# Altium PCB Audio_Meter_V3.2.PcbDoc (part 2 of 4)
Units mil, origin at the board's own origin, x right, y up, seen from the top; angles counter-clockwise.
Board outline 2756.14 x 2519.69 mil, 2 copper layers (Top Layer, Bottom Layer), stack 57 mil thick; 102 components, 57 nets, 306 pads, 131 vias.
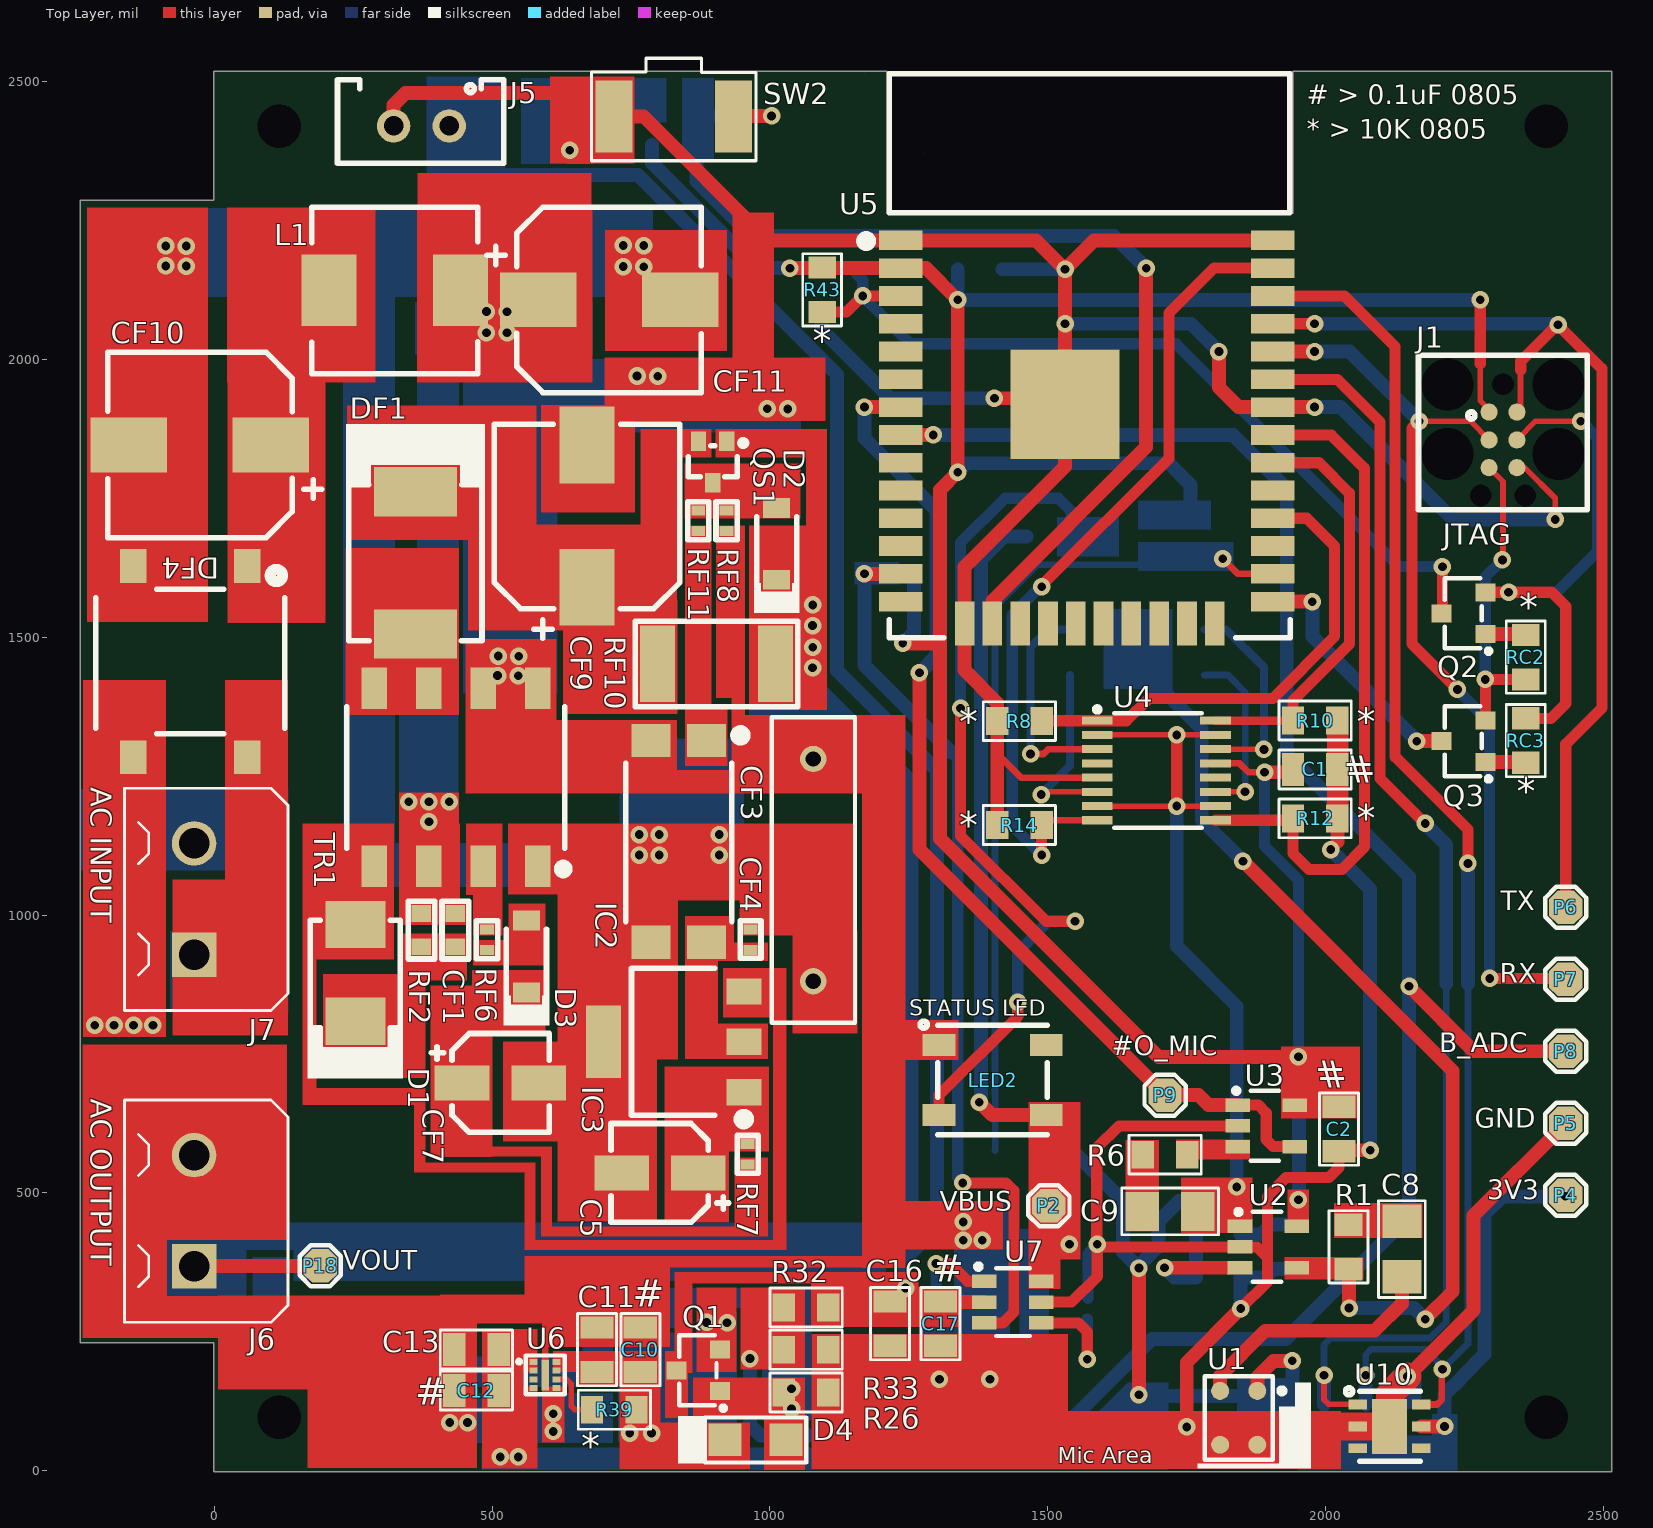
[diagram p0: Top Layer view]

## Part data (continued)
IC2: "OPTOISOLATOR 5.3KV TRANS 4SMD", Case/Package=SMD/SMT, Collector Emitter Saturation Voltage=400mV, Collector Emitter Voltage (VCEO)=70V, Current Transfer Ratio=320%, Forward Current=60mA, Forward Voltage=1.65V, Isolation Voltage=5.3kV, Manufacturer=Vishay, Max Collector Current=100mA, Max Operating Temperature=100°C, Max Power Dissipation=150mW, Min Operating Temperature=-55°C, Output Current per Channel=50mA, Package Quantity=2000, Reverse Breakdown Voltage=6V, Supplier Part Number 1=SFH615A-4X018TCT-ND, Category=Optocouplers, Fall Time=15us, Manufacturer Part Number=SFH615A-4X018T, Max Input Current=60mA, Max Output Voltage=70V, Mount="Surface Mount", Number of Channels=1, Number of Elements=1, Number of Pins=4, Packaging="Tape and Reel", Power Dissipation=150mW, Pricing 1="1=1.06000, 10=0.82300, 100=0.52880, 500=0.44650, 1000=0.35250 (USD)", Radiation Hardening=No, Rise Time=4us, RoHS=Yes, Stock 1=1486, Supplier 1=Digi-Key
IC3: "IC CTLR/MOSFET 100KHZ SOT223", Breakdown Voltage=700V, Case/Package=SOT-223-4, Manufacturer="ON Semiconductor", Max Input Voltage=250V, Max Operating Temperature=125°C, Max Output Current=450mA, Max Power Dissipation=19W, Max Supply Voltage=10V, Min Input Voltage=100V, Min Operating Temperature=-40°C, Package Quantity=1, Supplier Part Number 1=NCP1014ST100T3GOSCT-ND, Switching Frequency=100kHz, Category="Power Products", ComponentLink1Description=https://datasheet.ciiva.com/1930/ncp1010-d-1930949.pdf?src-supplier=Digi-Key, ComponentLink1URL=https://datasheet.ciiva.com/1930/ncp1010-d-1930949.pdf?src-supplier=Digi-Key, ComponentLink2Description=https://datasheet.ciiva.com/1930/ncp1010-d-1930950.pdf?src-supplier=Digi-Key, ComponentLink2URL=https://datasheet.ciiva.com/1930/ncp1010-d-1930950.pdf?src-supplier=Digi-Key, ComponentLink3Description=https://datasheet.ciiva.com/8197/ncp1010-d-8197482.pdf?src-supplier=Avnet, ComponentLink3URL=https://datasheet.ciiva.com/8197/ncp1010-d-8197482.pdf?src-supplier=Avnet, ComponentLink4Description=https://datasheet.ciiva.com/26081/ncp1010-d-26081498.pdf?src-supplier=Avnet+Europe, ComponentLink4URL=https://datasheet.ciiva.com/26081/ncp1010-d-26081498.pdf?src-supplier=Avnet+Europe, ComponentLink5Description=https://datasheet.ciiva.com/16469/ncp1010-d-16469819.pdf?src-supplier=Future+Electronics, ComponentLink5URL=https://datasheet.ciiva.com/16469/ncp1010-d-16469819.pdf?src-supplier=Future+Electronics, ComponentLink6Description=https://datasheet.ciiva.com/22628/1712830-22628780.pdf?src-supplier=Element14, ComponentLink6URL=https://datasheet.ciiva.com/22628/1712830-22628780.pdf?src-supplier=Element14, Duty Cycle=72%, Halogen Free="Halogen Free", Height=1.65mm, Lead Free="Lead Free", Length=6.7mm, Manufacturer Part Number=NCP1014ST100T3G, Max Duty Cycle=72%, Max Input Voltage (AC)=250V, Min Input Voltage (AC)=100V, Number of Pins=4, Output Current=450mA, Packaging="Tape and Reel", Power Rating=19W, Pricing 1="1=1.09000, 10=0.97200, 25=0.92280, 100=0.70840, 250=0.62604, 500=0.59310, 1000=0.46130 (USD)", Radiation Hardening=No, REACH SVHC="No SVHC", RoHS=Yes, Stock 1=17305, Supplier 1=Digi-Key, Topology=Flyback, Width=3.7mm
J1: "CABLE ADAPTER 6 POS", Manufacturer=Tag-Connect, Package Quantity=1, Supplier Part Number 1=TC2030-IDC-ND, ComponentLink1Description=http://www.tag-connect.com/Materials/TC2030-MCP%20Datasheet.pdf?src-supplier=Digi-Key, ComponentLink1URL=http://www.tag-connect.com/Materials/TC2030-MCP%20Datasheet.pdf?src-supplier=Digi-Key, Manufacturer Part Number=TC2030-IDC, Pricing 1="1=43.71 (USD)", Stock 1=284, Supplier 1=Digi-Key
J5: "CONN HEADER VERT 2POS 2.5MM", Color=Natural, Contact Resistance=20mR, Current Rating=3A, Housing Color=White, Manufacturer=JST, Max Operating Temperature=85°C, Max Voltage Rating (AC)=250V, Min Operating Temperature=-25°C, Supplier Part Number 1=455-1611-ND, ComponentLink1Description=http://uk.rs-online.com/webdocs/05aa/0900766b805aab1f.pdf?src-supplier=RSComponents, ComponentLink1URL=http://uk.rs-online.com/webdocs/05aa/0900766b805aab1f.pdf?src-supplier=RSComponents, ComponentLink2Description=http://www.jst-mfg.com/product/pdf/eng/eEH.pdf?src-supplier=Digi-Key, ComponentLink2URL=http://www.jst-mfg.com/product/pdf/eng/eEH.pdf?src-supplier=Digi-Key, ComponentLink3Description=https://www.verical.com/server-webapp/html/getDatasheet?partID=639961&src-supplier=Verical, ComponentLink3URL=https://www.verical.com/server-webapp/html/getDatasheet?partID=639961&src-supplier=Verical, ComponentLink4Description=http://www1.futureelectronics.com/doc/JST/B2B-EH-A(LF)(SN).pdf?src-supplier=Future+Electronics, ComponentLink4URL=http://www1.futureelectronics.com/doc/JST/B2B-EH-A(LF)(SN).pdf?src-supplier=Future+Electronics, ComponentLink5Description=http://www.produktinfo.conrad.com/datenblaetter/1200000-1299999/001217319-da-01-en-STIFTLEISTE_GERADE_2_POL__RM_25MM.pdf?src-supplier=Conrad, ComponentLink5URL=http://www.produktinfo.conrad.com/datenblaetter/1200000-1299999/001217319-da-01-en-STIFTLEISTE_GERADE_2_POL__RM_25MM.pdf?src-supplier=Conrad, Connector Type="Male Pin,Plug", Contact Material="Copper Alloy,Brass", Contact Mating Length=0.13inch, Contact Plating=Tin,Copper, Depth=3.8mm, Fastening Type=Detent, Gender=Male, Housing Material=Nylon, Lead Free="Lead Free", Length=7.5mm, Manufacturer Part Number=B2B-EH-A(LF)(SN), Max Current Rating=3A, Mount="Through Hole", Number of Contacts=2, Number of Positions=2, Number of Rows=1, Orientation=Straight, Packaging=Bulk, Pitch=2.5mm, Pricing 1="1=0.14, 10=0.131, 100=0.0809, 500=0.06698, 1000=0.05861, 5000=0.05024, 10000=0.04884 (USD)", Stock 1=25023, Supplier 1=Digi-Key, Termination=Press-Fit, Voltage Rating=250V
J6 J7: "TERMINAL BLOCK 2POS 5.08MM SIDE", Manufacturer="TE Connectivity", Manufacturer P/N=1776493-2
L1: library part DR74-821-R, "Inductor shielded 820uH 0.35A SMD", Case/Package=Nonstandard, Current Rating=310mA, DC Resistance (DCR)=2.93R, Inductance Tolerance=20%, Manufacturer="Eaton Cooper", Max Operating Temperature=125°C, Min Operating Temperature=-40°C, Package Quantity=1100, Resistor Type=Wirewound, Saturation Current=350mA, Self Resonant Frequency=100kHz, Supplier Part Number 1=513-1667-1-ND, Category="Fixed Inductors", ComponentLink1Description=https://datasheet.ciiva.com/14667/0900766b8116a153-14667792.pdf?src-supplier=RSComponents, ComponentLink1URL=https://datasheet.ciiva.com/14667/0900766b8116a153-14667792.pdf?src-supplier=RSComponents, ComponentLink2Description=https://datasheet.ciiva.com/26858/getdatasheetpartid-571272-26858465.pdf?src-supplier=Verical, ComponentLink2URL=https://datasheet.ciiva.com/26858/getdatasheetpartid-571272-26858465.pdf?src-supplier=Verical, ComponentLink3Description=https://datasheet.ciiva.com/30139/43bus-elx-ds-4315-dr-ser-30139975.pdf?src-supplier=Onlinecomponents.com, ComponentLink3URL=https://datasheet.ciiva.com/30139/43bus-elx-ds-4315-dr-ser-30139975.pdf?src-supplier=Onlinecomponents.com, ComponentLink4Description=https://datasheet.ciiva.com/16378/4a32919a-7470-4ae0-be45-b59e3a1351ef-16378457.pdf?src-supplier=Future+Electronics, ComponentLink4URL=https://datasheet.ciiva.com/16378/4a32919a-7470-4ae0-be45-b59e3a1351ef-16378457.pdf?src-supplier=Future+Electronics, ComponentLink5Description=https://datasheet.ciiva.com/4957/bus-elx-ds-4315-dr-series-4957657.pdf?src-supplier=Mouser, ComponentLink5URL=https://datasheet.ciiva.com/4957/bus-elx-ds-4315-dr-series-4957657.pdf?src-supplier=Mouser, ComponentLink6Description=https://datasheet.ciiva.com/8005/87246-8005245.pdf?src-supplier=Element14, ComponentLink6URL=https://datasheet.ciiva.com/8005/87246-8005245.pdf?src-supplier=Element14, ComponentLink7Description=https://datasheet.ciiva.com/48955/70037876-48955567.pdf?src-supplier=Allied+Electronics, ComponentLink7URL=https://datasheet.ciiva.com/48955/70037876-48955567.pdf?src-supplier=Allied+Electronics, Core Material=Ferrite, DC Current=310mA, Depth=7.6mm, Height=4.35mm, Height - Seated (Max)=0.171inch, Inductance=820uH, Lead Free="Lead Free", Length=7.6mm, Manufacturer Part Number=DR74-821-R, Max DC Current=310mA, Military Standard=Not, Mount="Surface Mount", Number of Pins=2, Packaging="Tape and Reel", Pricing 1="1=0.89000, 10=0.82900, 25=0.76520, 50=0.63760, 100=0.59930, 250=0.53552, 500=0.45900 (USD)", Radiation Hardening=No, REACH SVHC="No SVHC", RMS Current (Irms)=310mA, RoHS=Yes, Shielding=Shielded, Stock 1=498, Supplier 1=Digi-Key, Termination=SMD/SMT, Test Frequency=100kHz, Tolerance=20%, Weight=0.048oz, Width=0.299inch
LED2: "ADDRESS LED DISC SERIAL RGB 1=10", Color=Blue,Green,Red, Manufacturer="Adafruit Industries", Supplier Part Number 1=1528-1104-ND, ComponentLink1Description=https://cdn-shop.adafruit.com/product-files/1138/SK6812+LED+datasheet+.pdf?src-supplier=Digi-Key, ComponentLink1URL=https://cdn-shop.adafruit.com/product-files/1138/SK6812+LED+datasheet+.pdf?src-supplier=Digi-Key, ComponentLink2Description=http://www.mouser.com/ds/2/737/SK6812_LED_datasheet_-953546.pdf?src-supplier=Mouser, ComponentLink2URL=http://www.mouser.com/ds/2/737/SK6812_LED_datasheet_-953546.pdf?src-supplier=Mouser, Length=5mm, Manufacturer Part Number=1655, Mount="Surface Mount", Number of LEDs=10, Pricing 1="1=4.5 (USD)", Stock 1=2943, Supplier 1=Digi-Key, Width=5mm
P2 P4 P5 P6 P7 P8 P9 P18: "Test Point ON"
Q1: "MOSFET P-CHAN 24V SOT23", Case/Package=SOT-23, Continuous Drain Current (ID)=4.3A, Drain to Source Voltage (Vdss)=20V, Input Capacitance=634pF, Manufacturer=Diodes, Max Operating Temperature=150°C, Max Power Dissipation=800mW, Min Operating Temperature=-55°C, Supplier Part Number 1=DMP2045U-7DICT-ND, ComponentLink1Description=https://www.diodes.com/assets/Datasheets/DMP2045U.pdf?src-supplier=Digi-Key, ComponentLink1URL=https://www.diodes.com/assets/Datasheets/DMP2045U.pdf?src-supplier=Digi-Key, Manufacturer Part Number=DMP2045U-7, Mount="Surface Mount", Packaging="Tape and Reel", Pricing 1="1=0.45, 10=0.333, 100=0.1581, 500=0.12896, 1000=0.09568 (USD)", Rds On Max=45mR, Stock 1=22481, Supplier 1=Digi-Key
Q2 Q3: "TRANS NPN 40V 0.6A SMD SOT23-3", Case/Package=SOT-23, Collector Base Voltage (VCBO)=75V, Collector Emitter Breakdown Voltage=40V, Collector Emitter Saturation Voltage=1V, Continuous Collector Current=600mA, Current=1A, Emitter Base Voltage (VEBO)=6V, Frequency=300MHz, Manufacturer=Diodes, Max Operating Temperature=150°C, Max Power Dissipation=300mW, Min Operating Temperature=-55°C, Package Quantity=3000, Power Dissipation=350mW, Supplier Part Number 1=MMBT2222A-FDIDKR-ND, Collector Emitter Voltage (VCEO)=40V, ComponentLink1Description=http://www.diodes.com/datasheets/ds30041.pdf?src-supplier=Future+Electronics, ComponentLink1URL=http://www.diodes.com/datasheets/ds30041.pdf?src-supplier=Future+Electronics, ComponentLink2Description=http://www.diodes.com/datasheets/ds30041.pdf?src-supplier=Avnet, ComponentLink2URL=http://www.diodes.com/datasheets/ds30041.pdf?src-supplier=Avnet, ComponentLink3Description=https://www.verical.com/server-webapp/html/getDatasheet?partID=82692&src-supplier=Verical, ComponentLink3URL=https://www.verical.com/server-webapp/html/getDatasheet?partID=82692&src-supplier=Verical, ComponentLink4Description=https://www.diodes.com/assets/Datasheets/ds30041.pdf?src-supplier=Digi-Key, ComponentLink4URL=https://www.diodes.com/assets/Datasheets/ds30041.pdf?src-supplier=Digi-Key, ComponentLink5Description=http://www.diodes.com/datasheets/ds30041.pdf?src-supplier=Avnet+Europe, ComponentLink5URL=http://www.diodes.com/datasheets/ds30041.pdf?src-supplier=Avnet+Europe, ComponentLink6Description=http://www.diodes.com/datasheets/ds30041.pdf?src-supplier=Element14, ComponentLink6URL=http://www.diodes.com/datasheets/ds30041.pdf?src-supplier=Element14, Contact Plating=Matte,Tin, Current Rating=600mA, Element Configuration=Single, Gain Bandwidth Product=300MHz, Height=1mm, hFE Min=100, Lead Free="Lead Free", Length=3.05mm, Manufacturer Part Number=MMBT2222A-7-F, Max Breakdown Voltage=40V, Max Collector Current=600mA, Max Frequency=300MHz, Mount="Surface Mount", Number of Elements=1, Number of Pins=3, Packaging="Tape and Reel", Polarity=NPN, Pricing 1="1=0.15, 10=0.134, 100=0.0729, 500=0.04486, 1000=0.03059 (USD)", Radiation Hardening=No, REACH SVHC="No SVHC", Stock 1=2471182, Supplier 1=Digi-Key, Termination=SMD/SMT, Transition Frequency=300MHz, Voltage=40V, Voltage Rating (DC)=40V, Weight=0.000282oz, Width=1.4mm
Q4: "MOSFET N-CH 50V 200MA SOT-23", Case/Package=SOT-23-3, Continuous Drain Current (ID)=200mA, Drain to Source Breakdown Voltage=50V, Drain to Source Resistance=3.5R, Gate to Source Voltage (Vgs)=20V, Input Capacitance=50pF, Manufacturer="ON Semiconductor", Max Operating Temperature=150°C, Max Power Dissipation=225mW, Min Operating Temperature=-55°C, Package Quantity=1, Supplier Part Number 1=BSS138LT1GOSDKR-ND, Threshold Voltage=1.5V, ComponentLink1Description=https://datasheet.ciiva.com/22641/1596366-22641636.pdf, ComponentLink1URL=https://datasheet.ciiva.com/22641/1596366-22641636.pdf, ComponentLink2Description=https://datasheet.ciiva.com/1190/1596366-1190137.pdf, ComponentLink2URL=https://datasheet.ciiva.com/1190/1596366-1190137.pdf, ComponentLink3Description=https://datasheet.ciiva.com/15198/getdatasheetpartid-110266-15198908.pdf, ComponentLink3URL=https://datasheet.ciiva.com/15198/getdatasheetpartid-110266-15198908.pdf, ComponentLink4Description=https://datasheet.ciiva.com/8115/bss138lt1-d-8115295.pdf, ComponentLink4URL=https://datasheet.ciiva.com/8115/bss138lt1-d-8115295.pdf, ComponentLink5Description=https://datasheet.ciiva.com/8115/bss138lt1-d-8115358.pdf, ComponentLink5URL=https://datasheet.ciiva.com/8115/bss138lt1-d-8115358.pdf, ComponentLink6Description=https://datasheet.ciiva.com/1190/1596366-1190136.pdf, ComponentLink6URL=https://datasheet.ciiva.com/1190/1596366-1190136.pdf, ComponentLink7Description=https://datasheet.ciiva.com/936/bss138lt1-d-936802.pdf, ComponentLink7URL=https://datasheet.ciiva.com/936/bss138lt1-d-936802.pdf, ComponentLink8Description=https://datasheet.ciiva.com/936/bss138lt1-d-936801.pdf, ComponentLink8URL=https://datasheet.ciiva.com/936/bss138lt1-d-936801.pdf, ComponentLink9Description=https://datasheet.ciiva.com/14553/70099493-14553829.pdf, ComponentLink9URL=https://datasheet.ciiva.com/14553/70099493-14553829.pdf, ComponentLink10Description=https://datasheet.ciiva.com/936/bss138lt1-d-936803.pdf, ComponentLink10URL=https://datasheet.ciiva.com/936/bss138lt1-d-936803.pdf, ComponentLink11Description=http://www.onsemi.com/pub/Collateral/BSS138LT1-D.PDF?src-supplier=Digi-Key, ComponentLink11URL=http://www.onsemi.com/pub/Collateral/BSS138LT1-D.PDF?src-supplier=Digi-Key, ComponentLink12Description=http://www.farnell.com/datasheets/1596366.pdf?src-supplier=Element14, ComponentLink12URL=http://www.farnell.com/datasheets/1596366.pdf?src-supplier=Element14, ComponentLink13Description=http://www.alliedelec.com/m/d/b3c6fd7d92596813fe75d33dcbaaae90.pdf?src-supplier=Allied+Electronics, ComponentLink13URL=http://www.alliedelec.com/m/d/b3c6fd7d92596813fe75d33dcbaaae90.pdf?src-supplier=Allied+Electronics, ComponentLink14Description=https://www.verical.com/server-webapp/html/getDatasheet?partID=110266&src-supplier=Verical, ComponentLink14URL=https://www.verical.com/server-webapp/html/getDatasheet?partID=110266&src-supplier=Verical, ComponentLink15Description=http://www.onsemi.com/pub_link/Collateral/BSS138LT1-D.PDF?src-supplier=Avnet, ComponentLink15URL=http://www.onsemi.com/pub_link/Collateral/BSS138LT1-D.PDF?src-supplier=Avnet, Contact Plating=Tin,Matte, Current Rating=200mA, Element Configuration=Single, Halogen Free="Halogen Free", Height=1.01mm, Lead Free="Lead Free", Length=3.04mm, Manufacturer Part Number=BSS138LT1G, Nominal Vgs=1.5V, Number of Elements=1, Number of Pins=3, On-State Resistance=3.5R, Packaging="Tape and Reel", Power Dissipation=225mW, Pricing 1="1=0.27, 10=0.222, 100=0.1177, 500=0.07746, 1000=0.05267 (USD)", Radiation Hardening=No, Rds On Max=3.5R, REACH SVHC="No SVHC", Stock 1=1283212, Supplier 1=Digi-Key, Turn-Off Delay Time=20ns, Turn-On Delay Time=20ns, Voltage Rating (DC)=50V, Width=1.4mm
QS1: "TRANS PNP 60V 0.6A SOT323", Case/Package=SC, Collector Base Voltage (VCBO)=60V, Collector Emitter Saturation Voltage=-1.6V, Current Rating=-600mA, Emitter Base Voltage (VEBO)=5V, Frequency=200MHz, Manufacturer="ON Semiconductor", Max Collector Current=600mA, Max Operating Temperature=150°C, Max Power Dissipation=150mW, Min Operating Temperature=-55°C, Package Quantity=1, Supplier Part Number 1=MMBT2907AWT1GOSCT-ND, Voltage Rating (DC)=-60V, Category=BJTs, Collector Emitter Breakdown Voltage=60V, Collector Emitter Voltage (VCEO)=60V, ComponentLink1Description=https://datasheet.ciiva.com/15139/getdatasheetpartid-82693-15139079.pdf?src-supplier=Verical, ComponentLink1URL=https://datasheet.ciiva.com/15139/getdatasheetpartid-82693-15139079.pdf?src-supplier=Verical, ComponentLink2Description=https://datasheet.ciiva.com/4721/mmbt2907awt1-d-113164-4721597.pdf?src-supplier=Mouser, ComponentLink2URL=https://datasheet.ciiva.com/4721/mmbt2907awt1-d-113164-4721597.pdf?src-supplier=Mouser, ComponentLink3Description=https://datasheet.ciiva.com/976/mmbt2907awt1-d-976459.pdf?src-supplier=Digi-Key, ComponentLink3URL=https://datasheet.ciiva.com/976/mmbt2907awt1-d-976459.pdf?src-supplier=Digi-Key, ComponentLink4Description=https://datasheet.ciiva.com/7972/1708266-7972379.pdf?src-supplier=Element14, ComponentLink4URL=https://datasheet.ciiva.com/7972/1708266-7972379.pdf?src-supplier=Element14, ComponentLink5Description=https://datasheet.ciiva.com/11201/mmbt2907awt1-d-11201771.pdf?src-supplier=Avnet, ComponentLink5URL=https://datasheet.ciiva.com/11201/mmbt2907awt1-d-11201771.pdf?src-supplier=Avnet, ComponentLink6Description=https://datasheet.ciiva.com/26115/mmbt2907awt1-d-26115115.pdf?src-supplier=Avnet+Europe, ComponentLink6URL=https://datasheet.ciiva.com/26115/mmbt2907awt1-d-26115115.pdf?src-supplier=Avnet+Europe, ComponentLink7Description=https://datasheet.ciiva.com/976/mmbt2907awt1-d-976460.pdf?src-supplier=Digi-Key, ComponentLink7URL=https://datasheet.ciiva.com/976/mmbt2907awt1-d-976460.pdf?src-supplier=Digi-Key, ComponentLink8Description=https://datasheet.ciiva.com/7972/1708266-7972380.pdf?src-supplier=Element14, ComponentLink8URL=https://datasheet.ciiva.com/7972/1708266-7972380.pdf?src-supplier=Element14, ComponentLink9Description=https://datasheet.ciiva.com/22664/1708266-22664157.pdf?src-supplier=Element14, ComponentLink9URL=https://datasheet.ciiva.com/22664/1708266-22664157.pdf?src-supplier=Element14, ComponentLink10Description=https://datasheet.ciiva.com/22664/1708266-22664158.pdf?src-supplier=Element14, ComponentLink10URL=https://datasheet.ciiva.com/22664/1708266-22664158.pdf?src-supplier=Element14, Contact Plating=Tin,Matte, Element Configuration=Single, Gain Bandwidth Product=200MHz, Height=0.7mm, hFE Min=75, Lead Free="Lead Free", Length=2.2mm, Manufacturer Part Number=MMBT2907AWT1G, Max Breakdown Voltage=60V, Max Frequency=200MHz, Number of Elements=1, Number of Pins=3, Packaging="Tape and Reel", Polarity=PNP, Power Dissipation=150mW, Pricing 1="1=0.15000, 10=0.14000, 25=0.13360, 100=0.05890, 500=0.04622, 1000=0.03210 (USD)", Radiation Hardening=No, REACH SVHC="No SVHC", RoHS=Yes, Stock 1=32992, Supplier 1=Digi-Key, Transition Frequency=200MHz, Width=1.35mm
R1 R6: library part ERJ-P06J102V, "RES SMD 1K OHM 5% 1/2W 0805", Case/Package=0805, Case Code (Metric)=2012, Manufacturer=Panasonic, Max Operating Temperature=155°C, Max Power Dissipation=500mW, Min Operating Temperature=-55°C, Package Quantity=1, Supplier Part Number 1=P1.0KADCT-ND, Temperature Coefficient=200ppm/°C, Tolerance=5%, Voltage Rating=400V, Voltage Rating (DC)=150V, Case Code (Imperial)=0805, ComponentLink1Description=https://datasheet.ciiva.com/2474/crcwhpe3-2474640.pdf, ComponentLink1URL=https://datasheet.ciiva.com/2474/crcwhpe3-2474640.pdf, ComponentLink2Description=https://datasheet.ciiva.com/48527/crcwhpe3-48527638.pdf, ComponentLink2URL=https://datasheet.ciiva.com/48527/crcwhpe3-48527638.pdf, ComponentLink3Description=https://datasheet.ciiva.com/5547/crcwhpe3-46056-5547896.pdf, ComponentLink3URL=https://datasheet.ciiva.com/5547/crcwhpe3-46056-5547896.pdf, ComponentLink4Description=https://datasheet.ciiva.com/9112/crcwhpe3-9112140.pdf, ComponentLink4URL=https://datasheet.ciiva.com/9112/crcwhpe3-9112140.pdf, ComponentLink5Description=https://datasheet.ciiva.com/2474/crcwhpe3-2474638.pdf, ComponentLink5URL=https://datasheet.ciiva.com/2474/crcwhpe3-2474638.pdf, ComponentLink6Description=https://datasheet.ciiva.com/2474/crcwhpe3-2474639.pdf, ComponentLink6URL=https://datasheet.ciiva.com/2474/crcwhpe3-2474639.pdf, ComponentLink7Description=https://datasheet.ciiva.com/2474/crcwhpe3-2474641.pdf, ComponentLink7URL=https://datasheet.ciiva.com/2474/crcwhpe3-2474641.pdf, ComponentLink8Description=https://datasheet.ciiva.com/2474/crcwhpe3-2474642.pdf, ComponentLink8URL=https://datasheet.ciiva.com/2474/crcwhpe3-2474642.pdf, ComponentLink9Description=https://datasheet.ciiva.com/2474/crcwhpe3-2474643.pdf, ComponentLink9URL=https://datasheet.ciiva.com/2474/crcwhpe3-2474643.pdf, ComponentLink10Description=https://datasheet.ciiva.com/9051/crcwhpe3-9051301.pdf, ComponentLink10URL=https://datasheet.ciiva.com/9051/crcwhpe3-9051301.pdf, ComponentLink11Description=http://uk.rs-online.com/webdocs/12cb/0900766b812cb812.pdf?src-supplier=RSComponents, ComponentLink11URL=http://uk.rs-online.com/webdocs/12cb/0900766b812cb812.pdf?src-supplier=RSComponents, ComponentLink12Description=http://www.mouser.com/ds/2/315/AOA0000C291-1101061.pdf?src-supplier=Mouser, ComponentLink12URL=http://www.mouser.com/ds/2/315/AOA0000C291-1101061.pdf?src-supplier=Mouser, ComponentLink13Description=http://www.industrial.panasonic.com/www-data/pdf/AOA0000/AOA0000CE4.pdf?src-supplier=Element14, ComponentLink13URL=http://www.industrial.panasonic.com/www-data/pdf/AOA0000/AOA0000CE4.pdf?src-supplier=Element14, ComponentLink14Description=http://industrial.panasonic.com/www-data/pdf/AOA0000/AOA0000CE4.pdf?src-supplier=Avnet+Europe, ComponentLink14URL=http://industrial.panasonic.com/www-data/pdf/AOA0000/AOA0000CE4.pdf?src-supplier=Avnet+Europe, ComponentLink15Description=http://www.farnell.com/datasheets/2059624.pdf?src-supplier=Farnell, ComponentLink15URL=http://www.farnell.com/datasheets/2059624.pdf?src-supplier=Farnell, ComponentLink16Description=https://www.alliedelec.com/m/d/12e4be79354a6c30aae91f11e8182ea0.pdf?src-supplier=Allied+Electronics, ComponentLink16URL=https://www.alliedelec.com/m/d/12e4be79354a6c30aae91f11e8182ea0.pdf?src-supplier=Allied+Electronics, Composition="Thick Film", Contact Plating=Tin, Depth=1.25mm, Features="Automotive AEC-Q200", Height=0.6mm, Lead Free="Lead Free", Length=2mm, Manufacturer Part Number=ERJ-P06J102V, Military Standard=Not, Mount="Surface Mount", Number of Terminations=2, Packaging="Tape and Reel", Power Rating=500mW, Pricing 1="1=0.11, 10=0.103, 100=0.0396, 1000=0.0174, 2500=0.0151 (USD)", Radiation Hardening=No, REACH SVHC=Unknown, Resistance=1K, Stock 1=475568, Supplier 1=Digi-Key, Termination=SMD/SMT, Weight=0.000194oz, Width=0.049inch
R2 R3 R8 R10 R12 R14 R24 R29 R39 RC2 RC3: library part ERJ-P06J103V, "RES SMD 10K OHM 5% 1/2W 0805", Case/Package=0805, Case Code (Metric)=2012, Manufacturer=Panasonic, Max Operating Temperature=155°C, Max Power Dissipation=500mW, Min Operating Temperature=-55°C, Package Quantity=1, Supplier Part Number 1=P10KADCT-ND, Temperature Coefficient=200ppm/°C, Tolerance=5%, Voltage Rating=400V, Voltage Rating (DC)=150V, Case Code (Imperial)=0805, ComponentLink1Description=https://www.verical.com/server-webapp/html/getDatasheet?partID=409513, ComponentLink1URL=https://www.verical.com/server-webapp/html/getDatasheet?partID=409513, ComponentLink2Description=http://components.arrow.com/part/dataview/44988207S7163511N1174, ComponentLink2URL=http://components.arrow.com/part/dataview/44988207S7163511N1174, ComponentLink3Description=https://www.seielect.com/Catalog/SEI-RMCF_RMCP.pdf, ComponentLink3URL=https://www.seielect.com/Catalog/SEI-RMCF_RMCP.pdf, ComponentLink4Description=http://www.seielect.com/catalog/sei-rmc.pdf, ComponentLink4URL=http://www.seielect.com/catalog/sei-rmc.pdf, ComponentLink5Description=https://datasheet.ciiva.com/7777/424479-7777391.pdf, ComponentLink5URL=https://datasheet.ciiva.com/7777/424479-7777391.pdf, ComponentLink6Description=https://datasheet.ciiva.com/2581/crcwhpe3-2581488.pdf, ComponentLink6URL=https://datasheet.ciiva.com/2581/crcwhpe3-2581488.pdf, ComponentLink7Description=https://datasheet.ciiva.com/11808/0900766b80d98b26-11808546.pdf, ComponentLink7URL=https://datasheet.ciiva.com/11808/0900766b80d98b26-11808546.pdf, ComponentLink8Description=https://datasheet.ciiva.com/8934/dcrcwe3-8934585.pdf, ComponentLink8URL=https://datasheet.ciiva.com/8934/dcrcwe3-8934585.pdf, ComponentLink9Description=https://datasheet.ciiva.com/2467/dcrcwe3-2467241.pdf, ComponentLink9URL=https://datasheet.ciiva.com/2467/dcrcwe3-2467241.pdf, ComponentLink10Description=https://datasheet.ciiva.com/7777/1697337-7777401.pdf, ComponentLink10URL=https://datasheet.ciiva.com/7777/1697337-7777401.pdf, ComponentLink11Description=https://datasheet.ciiva.com/16852/dcrcwe3-16852347.pdf, ComponentLink11URL=https://datasheet.ciiva.com/16852/dcrcwe3-16852347.pdf, ComponentLink12Description=https://datasheet.ciiva.com/16200/dcrcwe3-16200123.pdf, ComponentLink12URL=https://datasheet.ciiva.com/16200/dcrcwe3-16200123.pdf, ComponentLink13Description=https://datasheet.ciiva.com/16725/70201119-16725227.pdf, ComponentLink13URL=https://datasheet.ciiva.com/16725/70201119-16725227.pdf, ComponentLink14Description=https://datasheet.ciiva.com/2467/dcrcwe3-2467239.pdf, ComponentLink14URL=https://datasheet.ciiva.com/2467/dcrcwe3-2467239.pdf, ComponentLink15Description=https://datasheet.ciiva.com/7777/1720486-7777575.pdf, ComponentLink15URL=https://datasheet.ciiva.com/7777/1720486-7777575.pdf, ComponentLink16Description=https://datasheet.ciiva.com/8934/dcrcwe3-8934581.pdf, ComponentLink16URL=https://datasheet.ciiva.com/8934/dcrcwe3-8934581.pdf, ComponentLink17Description=https://datasheet.ciiva.com/2467/dcrcwe3-2467240.pdf, ComponentLink17URL=https://datasheet.ciiva.com/2467/dcrcwe3-2467240.pdf, ComponentLink18Description=https://datasheet.ciiva.com/7777/1720486-7777576.pdf, ComponentLink18URL=https://datasheet.ciiva.com/7777/1720486-7777576.pdf, ComponentLink19Description=https://datasheet.ciiva.com/5546/dcrcwe3-109170-5546983.pdf, ComponentLink19URL=https://datasheet.ciiva.com/5546/dcrcwe3-109170-5546983.pdf, ComponentLink20Description=https://datasheet.ciiva.com/16755/70201119-16755757.pdf, ComponentLink20URL=https://datasheet.ciiva.com/16755/70201119-16755757.pdf, ComponentLink21Description=https://datasheet.ciiva.com/3258/dcrcwe3-3258221.pdf, ComponentLink21URL=https://datasheet.ciiva.com/3258/dcrcwe3-3258221.pdf, ComponentLink22Description=https://datasheet.ciiva.com/17204/dcrcwe3-17204398.pdf, ComponentLink22URL=https://datasheet.ciiva.com/17204/dcrcwe3-17204398.pdf, ComponentLink23Description=https://datasheet.ciiva.com/16435/dcrcwe3-16435934.pdf, ComponentLink23URL=https://datasheet.ciiva.com/16435/dcrcwe3-16435934.pdf, ComponentLink24Description=https://datasheet.ciiva.com/46441/1533075-46441628.pdf, ComponentLink24URL=https://datasheet.ciiva.com/46441/1533075-46441628.pdf, ComponentLink25Description=https://datasheet.ciiva.com/5544/dcrcwe3-109170-5544649.pdf, ComponentLink25URL=https://datasheet.ciiva.com/5544/dcrcwe3-109170-5544649.pdf, ComponentLink26Description=https://datasheet.ciiva.com/8337/dcrcwe3-8337669.pdf, ComponentLink26URL=https://datasheet.ciiva.com/8337/dcrcwe3-8337669.pdf, ComponentLink27Description=https://datasheet.ciiva.com/2463/dcrcwe3-2463179.pdf, ComponentLink27URL=https://datasheet.ciiva.com/2463/dcrcwe3-2463179.pdf, ComponentLink28Description=https://datasheet.ciiva.com/2463/dcrcwe3-2463178.pdf, ComponentLink28URL=https://datasheet.ciiva.com/2463/dcrcwe3-2463178.pdf, ComponentLink29Description=https://datasheet.ciiva.com/2474/crcwhpe3-2474640.pdf, ComponentLink29URL=https://datasheet.ciiva.com/2474/crcwhpe3-2474640.pdf, ComponentLink30Description=https://datasheet.ciiva.com/48527/crcwhpe3-48527638.pdf, ComponentLink30URL=https://datasheet.ciiva.com/48527/crcwhpe3-48527638.pdf, ComponentLink31Description=https://datasheet.ciiva.com/5547/crcwhpe3-46056-5547896.pdf, ComponentLink31URL=https://datasheet.ciiva.com/5547/crcwhpe3-46056-5547896.pdf, ComponentLink32Description=https://datasheet.ciiva.com/9112/crcwhpe3-9112140.pdf, ComponentLink32URL=https://datasheet.ciiva.com/9112/crcwhpe3-9112140.pdf, ComponentLink33Description=https://datasheet.ciiva.com/2474/crcwhpe3-2474638.pdf, ComponentLink33URL=https://datasheet.ciiva.com/2474/crcwhpe3-2474638.pdf, ComponentLink34Description=https://datasheet.ciiva.com/2474/crcwhpe3-2474639.pdf, ComponentLink34URL=https://datasheet.ciiva.com/2474/crcwhpe3-2474639.pdf, ComponentLink35Description=http://uk.rs-online.com/webdocs/12cb/0900766b812cb812.pdf?src-supplier=RSComponents, ComponentLink35URL=http://uk.rs-online.com/webdocs/12cb/0900766b812cb812.pdf?src-supplier=RSComponents, ComponentLink36Description=http://industrial.panasonic.com/www-data/pdf/AOA0000/AOA0000CE4.pdf?src-supplier=Avnet, ComponentLink36URL=http://industrial.panasonic.com/www-data/pdf/AOA0000/AOA0000CE4.pdf?src-supplier=Avnet, ComponentLink37Description=http://industrial.panasonic.com/www-data/pdf/AOA0000/AOA0000CE4.pdf?src-supplier=Future+Electronics, ComponentLink37URL=http://industrial.panasonic.com/www-data/pdf/AOA0000/AOA0000CE4.pdf?src-supplier=Future+Electronics, ComponentLink38Description=http://www.farnell.com/datasheets/2059624.pdf?src-supplier=Element14, ComponentLink38URL=http://www.farnell.com/datasheets/2059624.pdf?src-supplier=Element14, ComponentLink39Description=https://www.alliedelec.com/m/d/12e4be79354a6c30aae91f11e8182ea0.pdf?src-supplier=Allied+Electronics, ComponentLink39URL=https://www.alliedelec.com/m/d/12e4be79354a6c30aae91f11e8182ea0.pdf?src-supplier=Allied+Electronics, ComponentLink40Description=http://www.farnell.com/datasheets/2059624.pdf?src-supplier=Farnell, ComponentLink40URL=http://www.farnell.com/datasheets/2059624.pdf?src-supplier=Farnell, Composition="Thick Film", Contact Plating=Tin, Depth=1.25mm, Features="Automotive AEC-Q200", Height=0.6mm, Lead Free="Lead Free", Length=2mm, Manufacturer Part Number=ERJ-P06J103V, Military Standard=Not, Mount="Surface Mount", Number of Terminations=2, Packaging="Tape and Reel", Power Rating=500mW, Pricing 1="1=0.11, 10=0.103, 100=0.0396, 1000=0.0174, 2500=0.0151 (USD)", Radiation Hardening=No, REACH SVHC=Unknown, Resistance=10K, Stock 1=130484, Supplier 1=Digi-Key, Termination=SMD/SMT, Weight=0.000194oz, Width=0.049inch
R4 R5 R43 R56 R57: library part ERJ-P06J103V, "RES SMD 10K OHM 5% 1/2W 0805", Case/Package=0805, Case Code (Metric)=2012, Manufacturer=Panasonic, Max Operating Temperature=155°C, Max Power Dissipation=500mW, Min Operating Temperature=-55°C, Package Quantity=1, Resistance=10kR, Supplier Part Number 1=P10KADCT-ND, Temperature Coefficient=200ppm/°C, Tolerance=5%, Voltage Rating=400V, Voltage Rating (DC)=150V, Case Code (Imperial)=0805, ComponentLink1Description=https://www.verical.com/server-webapp/html/getDatasheet?partID=409513, ComponentLink1URL=https://www.verical.com/server-webapp/html/getDatasheet?partID=409513, ComponentLink2Description=http://components.arrow.com/part/dataview/44988207S7163511N1174, ComponentLink2URL=http://components.arrow.com/part/dataview/44988207S7163511N1174, ComponentLink3Description=https://www.seielect.com/Catalog/SEI-RMCF_RMCP.pdf, ComponentLink3URL=https://www.seielect.com/Catalog/SEI-RMCF_RMCP.pdf, ComponentLink4Description=http://www.seielect.com/catalog/sei-rmc.pdf, ComponentLink4URL=http://www.seielect.com/catalog/sei-rmc.pdf, ComponentLink5Description=https://datasheet.ciiva.com/7777/424479-7777391.pdf, ComponentLink5URL=https://datasheet.ciiva.com/7777/424479-7777391.pdf, ComponentLink6Description=https://datasheet.ciiva.com/2581/crcwhpe3-2581488.pdf, ComponentLink6URL=https://datasheet.ciiva.com/2581/crcwhpe3-2581488.pdf, ComponentLink7Description=https://datasheet.ciiva.com/11808/0900766b80d98b26-11808546.pdf, ComponentLink7URL=https://datasheet.ciiva.com/11808/0900766b80d98b26-11808546.pdf, ComponentLink8Description=https://datasheet.ciiva.com/8934/dcrcwe3-8934585.pdf, ComponentLink8URL=https://datasheet.ciiva.com/8934/dcrcwe3-8934585.pdf, ComponentLink9Description=https://datasheet.ciiva.com/2467/dcrcwe3-2467241.pdf, ComponentLink9URL=https://datasheet.ciiva.com/2467/dcrcwe3-2467241.pdf, ComponentLink10Description=https://datasheet.ciiva.com/7777/1697337-7777401.pdf, ComponentLink10URL=https://datasheet.ciiva.com/7777/1697337-7777401.pdf, ComponentLink11Description=https://datasheet.ciiva.com/16852/dcrcwe3-16852347.pdf, ComponentLink11URL=https://datasheet.ciiva.com/16852/dcrcwe3-16852347.pdf, ComponentLink12Description=https://datasheet.ciiva.com/16200/dcrcwe3-16200123.pdf, ComponentLink12URL=https://datasheet.ciiva.com/16200/dcrcwe3-16200123.pdf, ComponentLink13Description=https://datasheet.ciiva.com/16725/70201119-16725227.pdf, ComponentLink13URL=https://datasheet.ciiva.com/16725/70201119-16725227.pdf, ComponentLink14Description=https://datasheet.ciiva.com/2467/dcrcwe3-2467239.pdf, ComponentLink14URL=https://datasheet.ciiva.com/2467/dcrcwe3-2467239.pdf, ComponentLink15Description=https://datasheet.ciiva.com/7777/1720486-7777575.pdf, ComponentLink15URL=https://datasheet.ciiva.com/7777/1720486-7777575.pdf, ComponentLink16Description=https://datasheet.ciiva.com/8934/dcrcwe3-8934581.pdf, ComponentLink16URL=https://datasheet.ciiva.com/8934/dcrcwe3-8934581.pdf, ComponentLink17Description=https://datasheet.ciiva.com/2467/dcrcwe3-2467240.pdf, ComponentLink17URL=https://datasheet.ciiva.com/2467/dcrcwe3-2467240.pdf, ComponentLink18Description=https://datasheet.ciiva.com/7777/1720486-7777576.pdf, ComponentLink18URL=https://datasheet.ciiva.com/7777/1720486-7777576.pdf, ComponentLink19Description=https://datasheet.ciiva.com/5546/dcrcwe3-109170-5546983.pdf, ComponentLink19URL=https://datasheet.ciiva.com/5546/dcrcwe3-109170-5546983.pdf, ComponentLink20Description=https://datasheet.ciiva.com/16755/70201119-16755757.pdf, ComponentLink20URL=https://datasheet.ciiva.com/16755/70201119-16755757.pdf, ComponentLink21Description=https://datasheet.ciiva.com/3258/dcrcwe3-3258221.pdf, ComponentLink21URL=https://datasheet.ciiva.com/3258/dcrcwe3-3258221.pdf, ComponentLink22Description=https://datasheet.ciiva.com/17204/dcrcwe3-17204398.pdf, ComponentLink22URL=https://datasheet.ciiva.com/17204/dcrcwe3-17204398.pdf, ComponentLink23Description=https://datasheet.ciiva.com/16435/dcrcwe3-16435934.pdf, ComponentLink23URL=https://datasheet.ciiva.com/16435/dcrcwe3-16435934.pdf, ComponentLink24Description=https://datasheet.ciiva.com/46441/1533075-46441628.pdf, ComponentLink24URL=https://datasheet.ciiva.com/46441/1533075-46441628.pdf, ComponentLink25Description=https://datasheet.ciiva.com/5544/dcrcwe3-109170-5544649.pdf, ComponentLink25URL=https://datasheet.ciiva.com/5544/dcrcwe3-109170-5544649.pdf, ComponentLink26Description=https://datasheet.ciiva.com/8337/dcrcwe3-8337669.pdf, ComponentLink26URL=https://datasheet.ciiva.com/8337/dcrcwe3-8337669.pdf, ComponentLink27Description=https://datasheet.ciiva.com/2463/dcrcwe3-2463179.pdf, ComponentLink27URL=https://datasheet.ciiva.com/2463/dcrcwe3-2463179.pdf, ComponentLink28Description=https://datasheet.ciiva.com/2463/dcrcwe3-2463178.pdf, ComponentLink28URL=https://datasheet.ciiva.com/2463/dcrcwe3-2463178.pdf, ComponentLink29Description=https://datasheet.ciiva.com/2474/crcwhpe3-2474640.pdf, ComponentLink29URL=https://datasheet.ciiva.com/2474/crcwhpe3-2474640.pdf, ComponentLink30Description=https://datasheet.ciiva.com/48527/crcwhpe3-48527638.pdf, ComponentLink30URL=https://datasheet.ciiva.com/48527/crcwhpe3-48527638.pdf, ComponentLink31Description=https://datasheet.ciiva.com/5547/crcwhpe3-46056-5547896.pdf, ComponentLink31URL=https://datasheet.ciiva.com/5547/crcwhpe3-46056-5547896.pdf, ComponentLink32Description=https://datasheet.ciiva.com/9112/crcwhpe3-9112140.pdf, ComponentLink32URL=https://datasheet.ciiva.com/9112/crcwhpe3-9112140.pdf, ComponentLink33Description=https://datasheet.ciiva.com/2474/crcwhpe3-2474638.pdf, ComponentLink33URL=https://datasheet.ciiva.com/2474/crcwhpe3-2474638.pdf, ComponentLink34Description=https://datasheet.ciiva.com/2474/crcwhpe3-2474639.pdf, ComponentLink34URL=https://datasheet.ciiva.com/2474/crcwhpe3-2474639.pdf, ComponentLink35Description=http://uk.rs-online.com/webdocs/12cb/0900766b812cb812.pdf?src-supplier=RSComponents, ComponentLink35URL=http://uk.rs-online.com/webdocs/12cb/0900766b812cb812.pdf?src-supplier=RSComponents, ComponentLink36Description=http://industrial.panasonic.com/www-data/pdf/AOA0000/AOA0000CE4.pdf?src-supplier=Avnet, ComponentLink36URL=http://industrial.panasonic.com/www-data/pdf/AOA0000/AOA0000CE4.pdf?src-supplier=Avnet, ComponentLink37Description=http://industrial.panasonic.com/www-data/pdf/AOA0000/AOA0000CE4.pdf?src-supplier=Future+Electronics, ComponentLink37URL=http://industrial.panasonic.com/www-data/pdf/AOA0000/AOA0000CE4.pdf?src-supplier=Future+Electronics, ComponentLink38Description=http://www.farnell.com/datasheets/2059624.pdf?src-supplier=Element14, ComponentLink38URL=http://www.farnell.com/datasheets/2059624.pdf?src-supplier=Element14, ComponentLink39Description=https://www.alliedelec.com/m/d/12e4be79354a6c30aae91f11e8182ea0.pdf?src-supplier=Allied+Electronics, ComponentLink39URL=https://www.alliedelec.com/m/d/12e4be79354a6c30aae91f11e8182ea0.pdf?src-supplier=Allied+Electronics, ComponentLink40Description=http://www.farnell.com/datasheets/2059624.pdf?src-supplier=Farnell, ComponentLink40URL=http://www.farnell.com/datasheets/2059624.pdf?src-supplier=Farnell, Composition="Thick Film", Contact Plating=Tin, Depth=1.25mm, Features="Automotive AEC-Q200", Height=0.6mm, Lead Free="Lead Free", Length=2mm, Manufacturer Part Number=ERJ-P06J103V, Military Standard=Not, Mount="Surface Mount", Number of Terminations=2, Packaging="Tape and Reel", Power Rating=500mW, Pricing 1="1=0.11, 10=0.103, 100=0.0396, 1000=0.0174, 2500=0.0151 (USD)", Radiation Hardening=No, REACH SVHC=Unknown, Stock 1=130484, Supplier 1=Digi-Key, Termination=SMD/SMT, Weight=0.000194oz, Width=0.049inch
R7: library part CRCW080547K0FKEAHP, "RES SMD 47K OHM 1% 1/3W 0805", Case/Package=0805, Case Code (Metric)=2012, Manufacturer=Vishay, Max Operating Temperature=155°C, Max Power Dissipation=333mW, Min Operating Temperature=-55°C, Package Quantity=10, Power Rating=330mW, Temperature Coefficient=100ppm/°C, Tolerance=1%, Voltage Rating=150V, Case Code (Imperial)=0805, ComponentLink1Description=https://www.verical.com/server-webapp/html/getDatasheet?partID=409513, ComponentLink1URL=https://www.verical.com/server-webapp/html/getDatasheet?partID=409513, ComponentLink2Description=http://components.arrow.com/part/dataview/44988207S7163511N1174, ComponentLink2URL=http://components.arrow.com/part/dataview/44988207S7163511N1174, ComponentLink3Description=https://www.seielect.com/Catalog/SEI-RMCF_RMCP.pdf, ComponentLink3URL=https://www.seielect.com/Catalog/SEI-RMCF_RMCP.pdf, ComponentLink4Description=http://www.seielect.com/catalog/sei-rmc.pdf, ComponentLink4URL=http://www.seielect.com/catalog/sei-rmc.pdf, ComponentLink5Description=https://datasheet.ciiva.com/7777/424479-7777391.pdf, ComponentLink5URL=https://datasheet.ciiva.com/7777/424479-7777391.pdf, ComponentLink6Description=https://datasheet.ciiva.com/2581/crcwhpe3-2581488.pdf, ComponentLink6URL=https://datasheet.ciiva.com/2581/crcwhpe3-2581488.pdf, ComponentLink7Description=https://datasheet.ciiva.com/11808/0900766b80d98b26-11808546.pdf, ComponentLink7URL=https://datasheet.ciiva.com/11808/0900766b80d98b26-11808546.pdf, ComponentLink8Description=https://datasheet.ciiva.com/8934/dcrcwe3-8934585.pdf, ComponentLink8URL=https://datasheet.ciiva.com/8934/dcrcwe3-8934585.pdf, ComponentLink9Description=https://datasheet.ciiva.com/2467/dcrcwe3-2467241.pdf, ComponentLink9URL=https://datasheet.ciiva.com/2467/dcrcwe3-2467241.pdf, ComponentLink10Description=https://datasheet.ciiva.com/7777/1697337-7777401.pdf, ComponentLink10URL=https://datasheet.ciiva.com/7777/1697337-7777401.pdf, ComponentLink11Description=https://datasheet.ciiva.com/16852/dcrcwe3-16852347.pdf, ComponentLink11URL=https://datasheet.ciiva.com/16852/dcrcwe3-16852347.pdf, ComponentLink12Description=https://datasheet.ciiva.com/16200/dcrcwe3-16200123.pdf, ComponentLink12URL=https://datasheet.ciiva.com/16200/dcrcwe3-16200123.pdf, ComponentLink13Description=https://datasheet.ciiva.com/16725/70201119-16725227.pdf, ComponentLink13URL=https://datasheet.ciiva.com/16725/70201119-16725227.pdf, ComponentLink14Description=https://datasheet.ciiva.com/2467/dcrcwe3-2467239.pdf, ComponentLink14URL=https://datasheet.ciiva.com/2467/dcrcwe3-2467239.pdf, ComponentLink15Description=https://datasheet.ciiva.com/7777/1720486-7777575.pdf, ComponentLink15URL=https://datasheet.ciiva.com/7777/1720486-7777575.pdf, ComponentLink16Description=https://datasheet.ciiva.com/8934/dcrcwe3-8934581.pdf, ComponentLink16URL=https://datasheet.ciiva.com/8934/dcrcwe3-8934581.pdf, ComponentLink17Description=https://datasheet.ciiva.com/2467/dcrcwe3-2467240.pdf, ComponentLink17URL=https://datasheet.ciiva.com/2467/dcrcwe3-2467240.pdf, ComponentLink18Description=https://datasheet.ciiva.com/7777/1720486-7777576.pdf, ComponentLink18URL=https://datasheet.ciiva.com/7777/1720486-7777576.pdf, ComponentLink19Description=https://datasheet.ciiva.com/5546/dcrcwe3-109170-5546983.pdf, ComponentLink19URL=https://datasheet.ciiva.com/5546/dcrcwe3-109170-5546983.pdf, ComponentLink20Description=http://www.vishay.com/docs/20043/crcwhpe3.pdf?src-supplier=Digi-Key, ComponentLink20URL=http://www.vishay.com/docs/20043/crcwhpe3.pdf?src-supplier=Digi-Key, ComponentLink21Description=http://www.mouser.com/ds/2/427/crcwhpe3-46056.pdf?src-supplier=Mouser, ComponentLink21URL=http://www.mouser.com/ds/2/427/crcwhpe3-46056.pdf?src-supplier=Mouser, ComponentLink22Description=http://www.farnell.com/datasheets/2140397.pdf?src-supplier=Element14, ComponentLink22URL=http://www.farnell.com/datasheets/2140397.pdf?src-supplier=Element14, ComponentLink23Description=http://www.vishay.com/docs/20043/crcwhpe3.pdf?src-supplier=Avnet, ComponentLink23URL=http://www.vishay.com/docs/20043/crcwhpe3.pdf?src-supplier=Avnet, Composition="Thick Film", Contact Plating=Tin, Depth=1.25mm, Features="Automotive AEC-Q200", Height=0.024inch, Lead Free="Lead Free", Length=2mm, Manufacturer Part Number=CRCW080547K0FKEAHP, Mount="Surface Mount", Number of Terminations=2, Packaging="Cut Tape", Pricing 1="1=0.2375, 10=0.2014, 25=0.1942 (USD)", REACH SVHC=Unknown, Resistance=47K, Stock 1=55, Supplier 1=Arrow, Supplier Part Number 1=CRCW080547K0FKEAHP, Termination=SMD/SMT, Voltage Rating (DC)=150V, Weight=0.000194oz, Width=1.2mm